# Altium PCB OFP_CIM_v1.5.PcbDoc (part 2 of 3)
Units mil, origin at the board's own origin, x right, y up, seen from the top; angles counter-clockwise.
Board outline 4311.02 x 2539.37 mil, 4 copper layers (Top Layer, Layer 1, Layer 2, Bottom Layer), stack 62.047 mil thick; 193 components, 140 nets, 567 pads, 380 vias.
Unrouted connection lines stored in the file: 1.
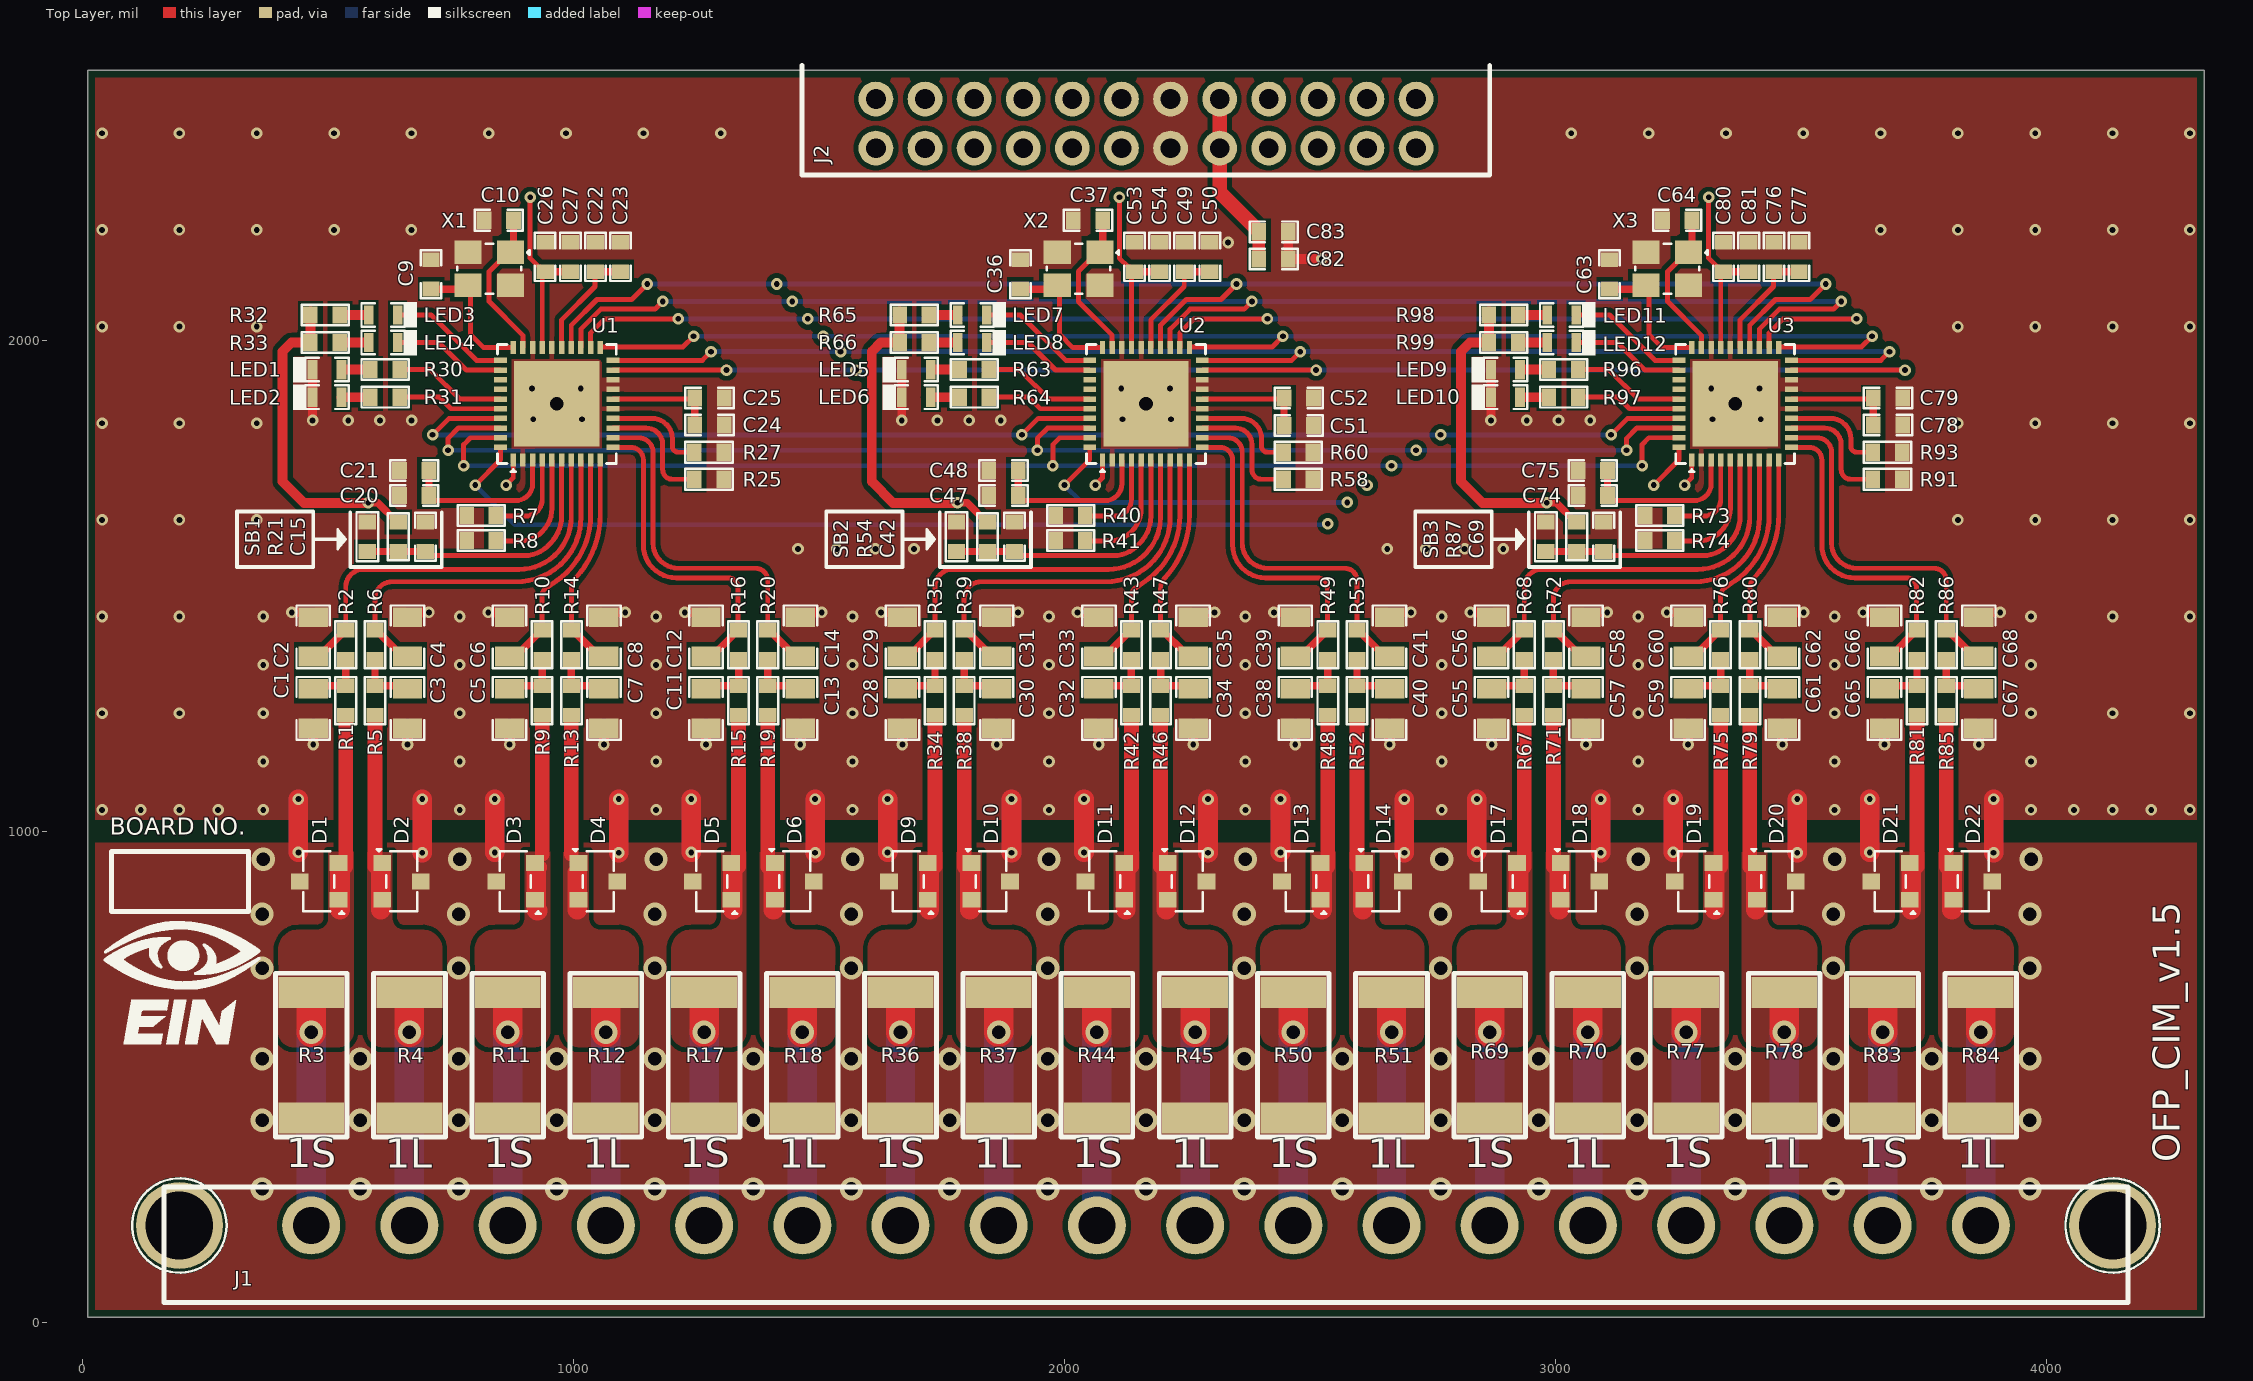
[diagram p0: Top Layer view]

## Via types
v1: diameter 23.62, hole 11.81, Top Layer to Bottom Layer, tented both sides, 272 vias
v2: diameter 47.24, hole 27.56, Top Layer to Bottom Layer, tented both sides, 108 vias

## Nets (pads, with @x,y where several pads share a name; then routed paths per layer and width w, separated by ;. In a path a pad name is that pad's centre, name@x,y a point inside that pad or via, vN(x,y) a via of type N, cw(c..) or ccw(c..) an arc to the next point about the centre after c; other vN are vias at no path point) (continued)
IB_P3: D19.1 D19.2 J1.15 R75.1 R77.2 | length 857.2
  Top Layer w20: 3323.82,916.34 ccw(c3323.82,928.15) D19.2@3335.63,928.15
  Top Layer w30: D19.2@3335.63,928.15 R75.1@3335.63,1235.84
  Top Layer w40: 3323.82,840.35 3323.82,916.34
  Top Layer w60: v2(3265.35,590.55) R77.2@3265.35,651.77
  Bottom Layer w60: J1.15@3265.35,196.85 v2(3265.35,590.55)
IBN1: C8.1 R14.2 U1.10 | length 445.7
  Top Layer w10: R14.2@995.08,1409.51 995.08,1494 cw(c1025.83,1494) 1002.4,1513.92 cw(c1025.83,1494) 1004.09,1515.75 ccw(c862.56,1644.57) 1053.94,1644.57 U1.10@1053.94,1754.13
  Top Layer w15: R14.2@995.08,1409.51 1005.08,1402.01 1038.92,1368.01 C8.1@1061.42,1355.51
IBN2: C35.1 R47.2 U2.10 | length 445.7
  Top Layer w10: R47.2@2195.08,1409.51 2195.08,1494 cw(c2225.83,1494) 2202.4,1513.92 cw(c2225.83,1494) 2204.09,1515.75 ccw(c2062.56,1644.57) 2253.94,1644.57 U2.10@2253.94,1754.13
  Top Layer w15: R47.2@2195.08,1409.51 2205.08,1402.01 2238.92,1368.01 C35.1@2261.42,1355.51
IBN3: C62.1 R80.2 U3.10 | length 445.7
  Top Layer w10: R80.2@3395.08,1409.51 3395.08,1494 cw(c3425.83,1494) 3402.4,1513.92 cw(c3425.83,1494) 3404.09,1515.75 ccw(c3262.56,1644.57) 3453.94,1644.57 U3.10@3453.94,1754.13
  Top Layer w15: R80.2@3395.08,1409.51 3405.08,1402.01 3438.92,1368.01 C62.1@3461.42,1355.51
IBP1: C6.2 R10.2 U1.9 | length 467.3
  Top Layer w10: R10.2@935.63,1409.51 935.63,1479.38 cw(c955.63,1479.38) 941.47,1493.5 ; 941.49,1493.52 964.32,1509.21 ccw(c873.05,1642.08) 1034.25,1642.08 U1.9@1034.25,1754.13
  Top Layer w15: C6.2@869.29,1355.51 891.79,1366.43 927.2,1402.01 R10.2@934.67,1409.51
IBP2: C33.2 R43.2 U2.9 | length 467.3
  Top Layer w10: R43.2@2135.63,1409.51 2135.63,1479.38 cw(c2155.63,1479.38) 2141.47,1493.5 ; 2141.49,1493.52 2164.32,1509.21 ccw(c2073.05,1642.08) 2234.25,1642.08 U2.9@2234.25,1754.13
  Top Layer w15: C33.2@2069.29,1355.51 2091.79,1366.43 2127.2,1402.01 R43.2@2134.67,1409.51
IBP3: C60.2 R76.2 U3.9 | length 467.3
  Top Layer w10: R76.2@3335.63,1409.51 3335.63,1479.38 cw(c3355.63,1479.38) 3341.47,1493.5 ; 3341.49,1493.52 3364.32,1509.21 ccw(c3273.05,1642.08) 3434.25,1642.08 U3.9@3434.25,1754.13
  Top Layer w15: C60.2@3269.29,1355.52 3291.79,1366.43 3327.2,1402.01 R76.2@3334.67,1409.51
IC_N1: D6.1 D6.2 J1.6 R18.1 R19.1 | length 857.2
  Top Layer w20: D6.1@1395.08,928.15 ccw(c1406.89,928.15) 1406.89,916.34
  Top Layer w30: D6.1@1395.08,928.15 R19.1@1395.08,1235.84
  Top Layer w40: 1406.89,839.57 1406.89,915.55
  Top Layer w60: v2(1465.35,590.55) R18.1@1465.35,651.77
  Bottom Layer w60: J1.6@1465.35,196.85 v2(1465.35,590.55)
IC_N2: D14.1 D14.2 J1.12 R51.1 R52.1 | length 857.2
  Top Layer w20: D14.1@2595.08,928.15 ccw(c2606.89,928.15) 2606.89,916.34
  Top Layer w30: D14.1@2595.08,928.15 R52.1@2595.08,1235.84
  Top Layer w40: 2606.89,839.57 2606.89,915.55
  Top Layer w60: v2(2665.35,590.55) R51.1@2665.35,651.77
  Bottom Layer w60: J1.12@2665.35,196.85 v2(2665.35,590.55)
IC_N3: D22.1 D22.2 J1.18 R84.1 R85.1 | length 857.2
  Top Layer w20: D22.1@3795.08,928.15 ccw(c3806.89,928.15) 3806.89,916.34
  Top Layer w30: D22.1@3795.08,928.15 R85.1@3795.08,1235.84
  Top Layer w40: 3806.89,839.57 3806.89,915.55
  Top Layer w60: v2(3865.35,590.55) R84.1@3865.35,651.77
  Bottom Layer w60: J1.18@3865.35,196.85 v2(3865.35,590.55)
IC_P1: D5.1 D5.2 J1.5 R15.1 R17.2 | length 857.2
  Top Layer w20: 1323.82,916.34 ccw(c1323.82,928.15) D5.2@1335.63,928.15
  Top Layer w30: D5.2@1335.63,928.15 R15.1@1335.63,1235.84
  Top Layer w40: 1323.82,840.35 1323.82,916.34
  Top Layer w60: v2(1265.35,590.55) R17.2@1265.35,651.77
  Bottom Layer w60: J1.5@1265.35,196.85 v2(1265.35,590.55)
IC_P2: D13.1 D13.2 J1.11 R48.1 R50.2 | length 857.2
  Top Layer w20: 2523.82,916.34 ccw(c2523.82,928.15) D13.2@2535.63,928.15
  Top Layer w30: D13.2@2535.63,928.15 R48.1@2535.63,1235.84
  Top Layer w40: 2523.82,840.35 2523.82,916.34
  Top Layer w60: v2(2465.35,590.55) R50.2@2465.35,651.77
  Bottom Layer w60: J1.11@2465.35,196.85 v2(2465.35,590.55)
IC_P3: D21.1 D21.2 J1.17 R81.1 R83.2 | length 857.2
  Top Layer w20: 3723.82,916.34 ccw(c3723.82,928.15) D21.2@3735.63,928.15
  Top Layer w30: D21.2@3735.63,928.15 R81.1@3735.63,1235.84
  Top Layer w40: 3723.82,840.35 3723.82,916.34
  Top Layer w60: v2(3665.35,590.55) R83.2@3665.35,651.77
  Bottom Layer w60: J1.17@3665.35,196.85 v2(3665.35,590.55)
ICN1: C14.1 R20.2 U1.12 | length 761.5
  Top Layer w10: U1.12@1081.3,1801.18 1131.89,1801.18 cw(c1131.89,1771.65) 1161.42,1771.65 1161.42,1586.61 ccw(c1212.6,1586.61) 1212.6,1535.43 1370.08,1535.43 cw(c1370.08,1510.43) 1395.08,1510.43 R20.2@1395.08,1409.51 ; R20.2@1395.08,1413.39 R20.2@1405.83,1402.64
  Top Layer w15: R20.2@1395.08,1409.51 1405.08,1402.01 1438.92,1368.01 C14.1@1461.42,1355.51
ICN2: C41.1 R53.2 U2.12 | length 746.3
  Top Layer w10: U2.12@2281.3,1801.18 2331.89,1801.18 cw(c2331.89,1771.65) 2361.42,1771.65 2361.42,1586.61 ccw(c2412.6,1586.61) 2412.6,1535.43 2570.08,1535.43 cw(c2570.08,1510.43) 2595.08,1510.43 R53.2@2595.08,1409.51
  Top Layer w15: R53.2@2595.08,1409.51 2605.08,1402.01 2638.92,1368.01 C41.1@2661.42,1355.51
ICN3: C68.1 R86.2 U3.12 | length 746.3
  Top Layer w10: U3.12@3481.3,1801.18 3531.89,1801.18 cw(c3531.89,1771.65) 3561.42,1771.65 3561.42,1586.61 ccw(c3612.6,1586.61) 3612.6,1535.43 3770.08,1535.43 cw(c3770.08,1510.43) 3795.08,1510.43 R86.2@3795.08,1409.51
  Top Layer w15: R86.2@3795.08,1409.51 3805.08,1402.01 3838.92,1368.01 C68.1@3861.42,1355.51